# Altium PCB Battery_Module.PcbDoc
Units mm, origin at the board's own origin, x right, y up, seen from the top; angles counter-clockwise.
Board outline 80 x 50 mm, 2 copper layers (Top Layer, Bottom Layer), stack 1.591 mm thick; 24 components, 15 nets, 103 pads, 111 vias.
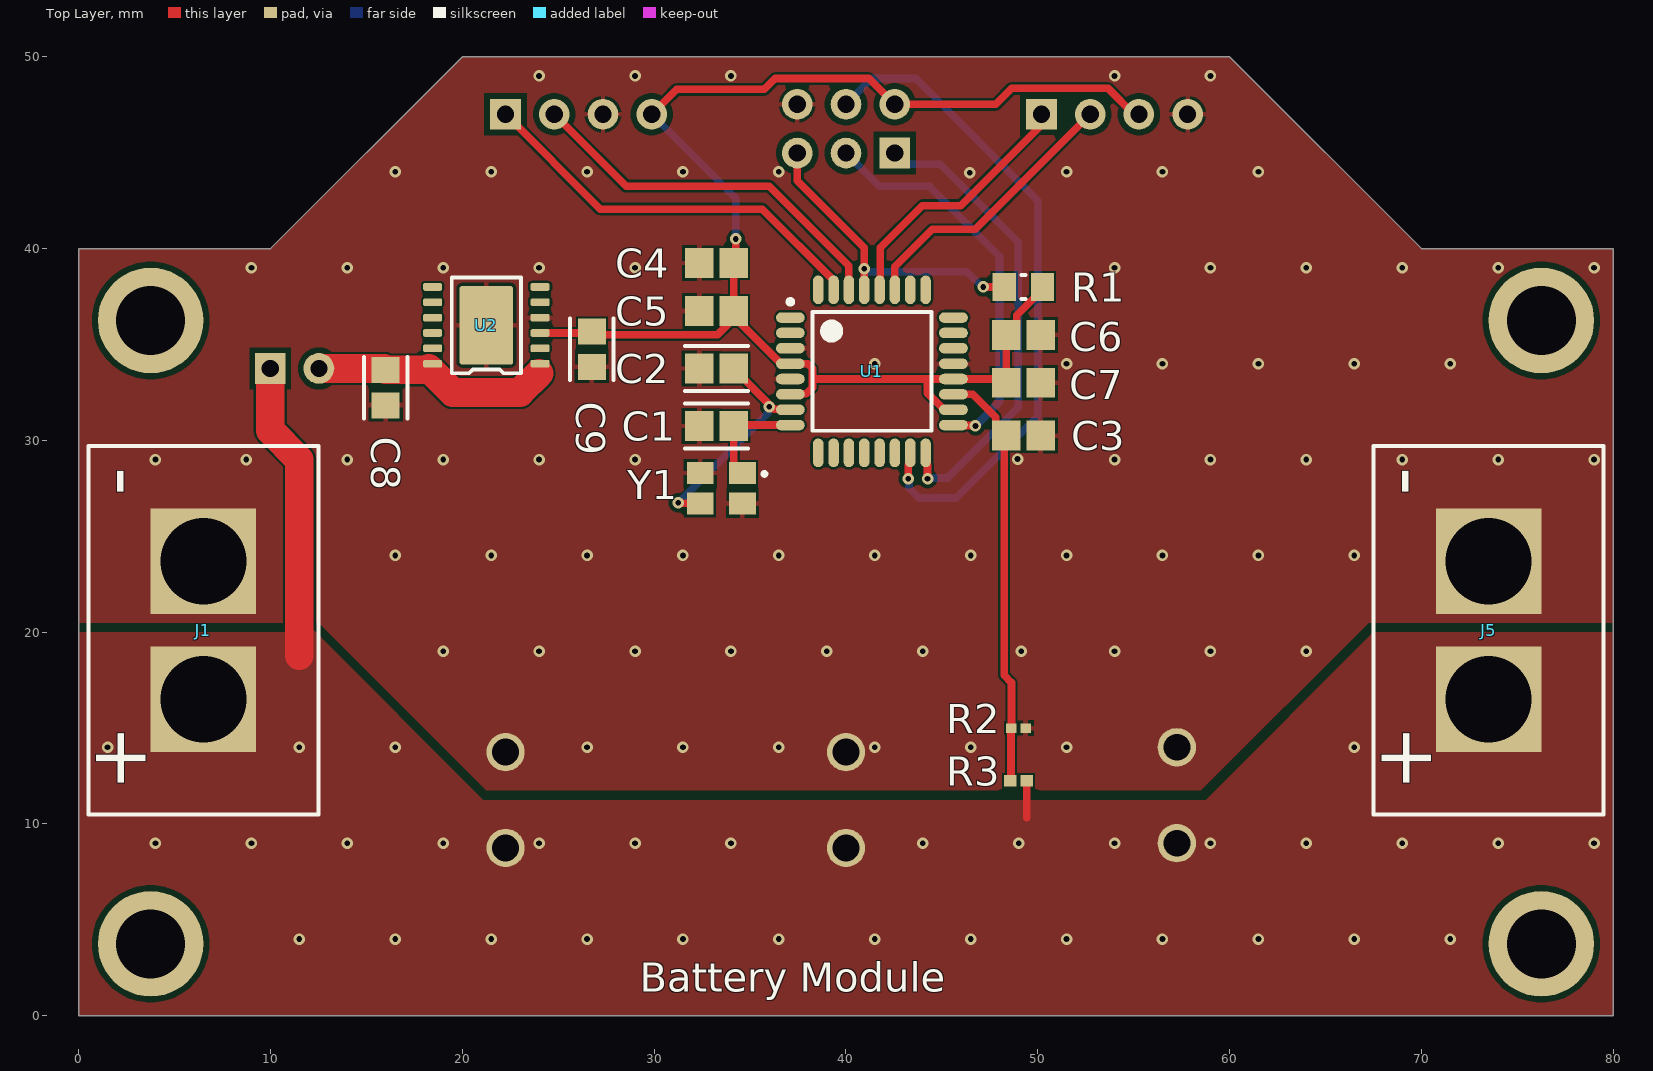
[diagram p0: Top Layer view]
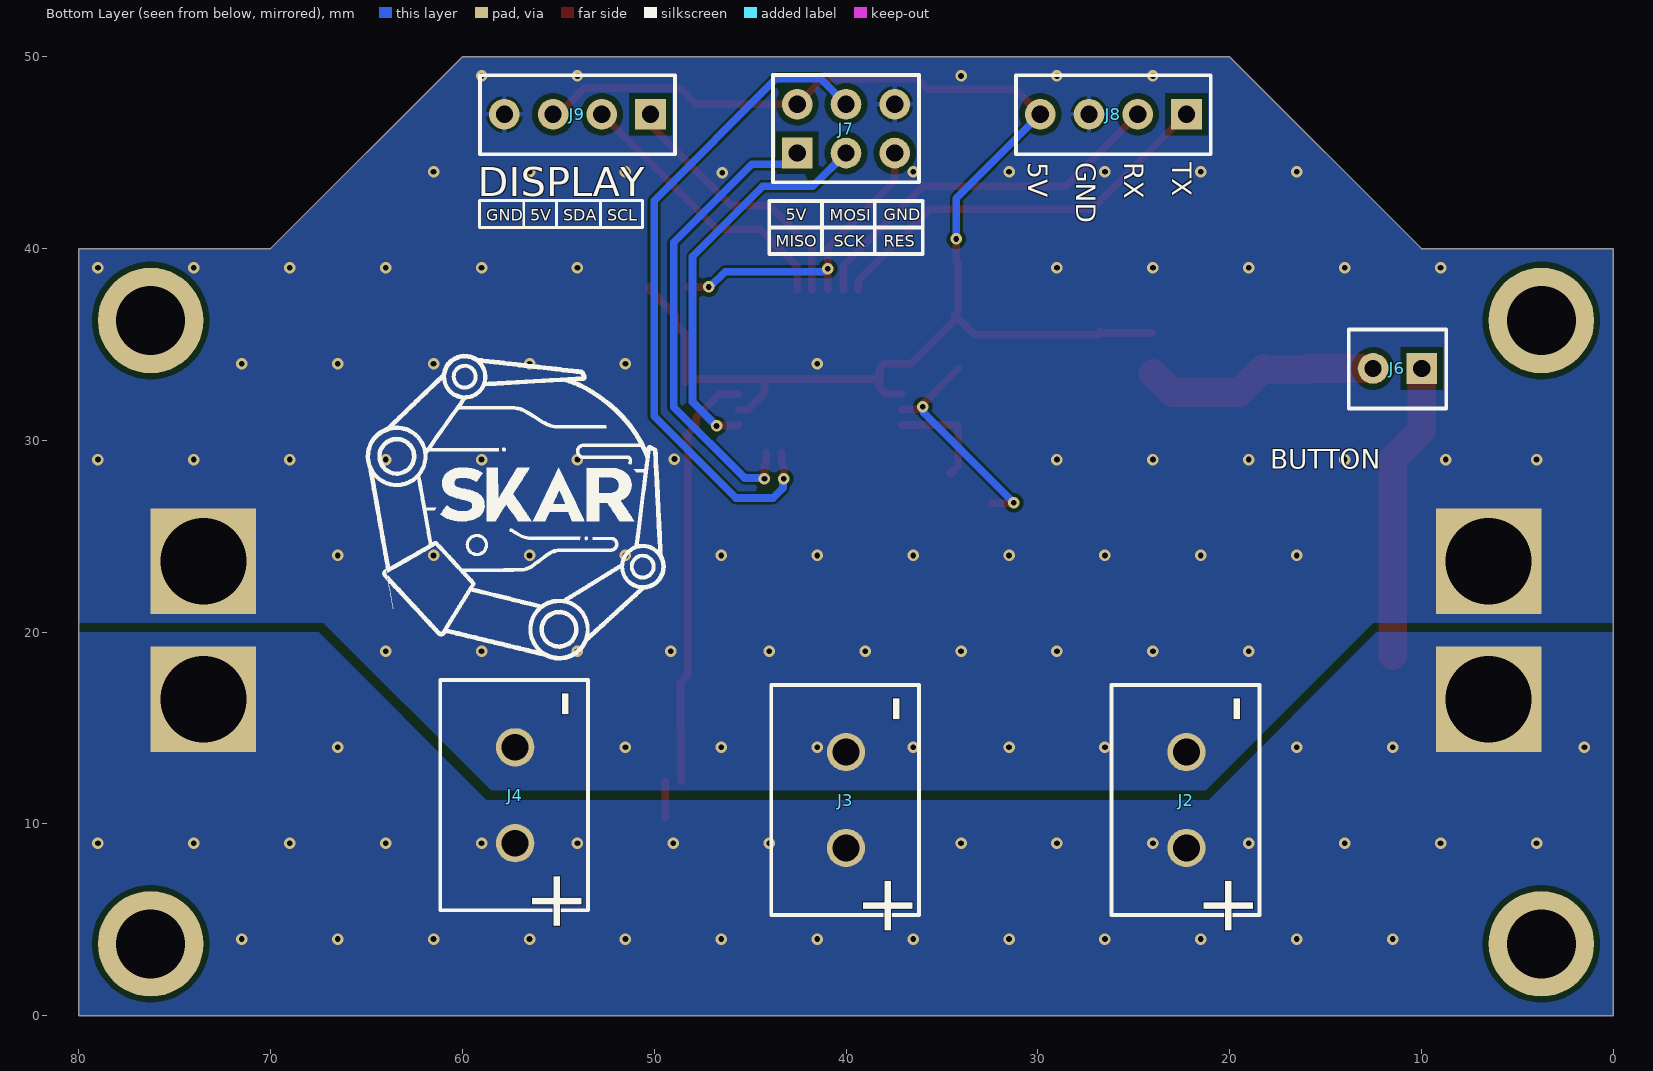
[diagram p1: Bottom Layer view, seen from below]

## Layer stack, top to bottom
Top Solder: solder mask 0.0102, Solder Resist, Dk 3.5
Top Layer: signal copper 0.0356
Dielectric 1: dielectric 1.52, FR-4, Dk 4.8
Bottom Layer: signal copper 0.0356
Bottom Solder: solder mask 0.0102, Solder Resist, Dk 3.5

## Board outline
10,40 20,50 60,50 70,40 80,40 80,0 0,0 0,40

## Design rules (kind name [scope] priority, off if disabled: settings)
Clearance [All] p1: gap=0.12 ignorepadtopadclearanceinfootprint=FALSE except(0.1: Arc-SMDPad Track-SMDPad; 0.15: SMDPad-SMDPad; 0.2: Arc-Via Track-Via Via-Fill Via-Poly Via-Region; 0.3: Arc-Hole Track-Hole SMDPad-Hole THPad-Fill THPad-Poly THPad-Region THPad-Hole Via-Hole Fill-Hole Poly-Hole Region-Hole Text-Hole; 0.35: Arc-THPad Track-THPad)
HoleSize [All] p1: absolutevalues=TRUE maxlimit=5 minlimit=0.025 maxpercent=80.000 minpercent=20.000
MinimumSolderMaskSliver [All] p1: minsoldermaskwidth=0.04
PolygonConnect PolygonConnectPWR [All vs HasFootprint('XT60_FEMALE_PANEL') OR HasFootprint('Phoenix')] p1: connectstyle=Direct reliefconductorwidth=0.254 reliefentries=4 polygonreliefangle="90 Angle" airgapwidth=0.254
PolygonConnect [All] p2: thpad.connectstyle=Relief thpad.reliefconductorwidth=0.254 thpad.reliefentries=4 thpad.polygonreliefangle="90 Angle" thpad.airgapwidth=0.15 smdpad.connectstyle=Relief smdpad.reliefconductorwidth=0.254 smdpad.reliefentries=4 smdpad.polygonreliefangle="90 Angle" smdpad.airgapwidth=0.15 via.connectstyle=Direct via.reliefconductorwidth=0.254 via.reliefentries=4 via.polygonreliefangle="90 Angle" via.airgapwidth=0.15
RoutingVias [All] p1: holewidth=0.2 width=0.4 viastyle="Through Hole" minholewidth=0.2 minwidth=0.4 maxholewidth=5 maxwidth=10
SilkToSilkClearance [All] p1: silktosilkclearance=0
SilkToSolderMaskClearance [IsPad] p1: minsilkscreentomaskgap=0.015 clearancetoexposedcopper=TRUE
SolderMaskExpansion [All] p1: expansion=0.04 istentingtop=FALSE
SupplyNets "Schematic Supply Nets_2" [InNet('VIN')] p1: voltage=0.000
SupplyNets "Schematic Supply Nets_1" [InNet('+5V')] p2: voltage=0.000
SupplyNets "Schematic Supply Nets" [InNet('GND')] p3: voltage=0.000
Width Width_1 [All] p1: maxlimit=3 minlimit=0.254 preferedwidth=0.4
Width [All] p2: maxlimit=0.625 minlimit=0.254 preferedwidth=0.4 minimp=50.000000 maximp=50.000000 favimp=50.000000
26 further rules are at their usual default settings.

## Components (designator, comment, footprint, x,y, rotation, side; value= is the part's Value field where it differs from the comment)
C1 "16pF" FP-C0805C-DN-IPC_A 33.25,30.75 r0 top value="16 pF"
C2 "16pF" FP-C0805C-DN-IPC_A 33.25,33.75 r0 top value="16 pF"
C3 "100nF" CAPC2013X140X50ML20T25 49.25,30.25 r180 top
C4 "100nF" CAPC2013X140X50ML20T25 33.25,39.25 r180 top
C5 "100nF" CAPC2013X140X50ML20T25 33.25,36.75 r180 top
C6 "100nF" CAPC2013X140X50ML20T25 49.25,35.5 r0 top
C7 "100nF" CAPC2013X140X50ML20T25 49.25,33 r0 top
C8 "10uF" FP-GRM21B-0_1-IPC_A 16,32.75 r270 top
C9 "10uF" FP-GRM21B-0_1-IPC_A 26.75,34.75 r270 top
J1 "XT60" XT60_FEMALE_PANEL 6.5,16.5 r90 top
J2 "Phoenix" PHOENIX 22.25,8.75 r270 bottom
J3 "Phoenix" PHOENIX 40,8.75 r270 bottom
J4 "Phoenix" PHOENIX 57.25,9 r270 bottom
J5 "XT60" XT60_FEMALE_PANEL 73.5,16.5 r90 top
J6 "BUTTON" HEADER1X2 11.25,33.75 r270 bottom
J7 "" "HEADER2X3 - DUPLICATE" 40,46.25 r90 bottom
J8 "" HEADER1X4 26.06,47 r270 bottom
J9 "DISPLAY" HEADER1X4 54,47 r270 bottom
R1 "10k" RESC2013X60X35ML10T20 49.25,38 r0 top
R2 "10k" RESC1005X40X25LL10T10 49,15 r180 top
R3 "51K" RESC1005X40X25NL10T10 49,12.25 r0 top
U1 "ATMEGA328P-AU" ATMEGA328P-AU 41.35,33.6 r0 top
U2 "L99VR035PTR" PWSSO-12 21.25,36 r90 top
Y1 "16MHz" WE-XTAL_CFPX-180 33.5,27.5 r180 top

## Footprints (in the part's own frame and the unit in brackets; to place one, negate y for a bottom-side part, rotate by r counter-clockwise, add the part's x,y. Pads: shape width x height; smd on the part's side, far side on the other; paste and mask are expansions set on the pad)
ATMEGA328P-AU [mm] "TQFP, 32-Leads, Body 7,00x7,00mm, Pitch 0,80mm, IPC Medium Density"
  oval 1.5x0.55 smd: 1(-4.25,2.8) 2(-4.25,2) 3(-4.25,1.2) 4(-4.25,0.4) 5(-4.25,-0.4) 6(-4.25,-1.2) 7(-4.25,-2) 8(-4.25,-2.8) 17(4.25,-2.8) 18(4.25,-2) 19(4.25,-1.2) 20(4.25,-0.4) 21(4.25,0.4) 22(4.25,1.2) 23(4.25,2) 24(4.25,2.8)
  oval 0.55x1.5 smd: 9(-2.8,-4.25) 10(-2,-4.25) 11(-1.2,-4.25) 12(-0.4,-4.25) 13(0.4,-4.25) 14(1.2,-4.25) 15(2,-4.25) 16(2.8,-4.25) 25(2.8,4.25) 26(2,4.25) 27(1.2,4.25) 28(0.4,4.25) 29(-0.4,4.25) 30(-1.2,4.25) 31(-2,4.25) 32(-2.8,4.25)
  silkscreen extent -4.37,-3.1 3.1,3.75, body extent -4.5,-4.5 4.5,4.5, height 1.2
CAPC2013X140X50ML20T25 [mm] "Chip Capacitor, 2-Leads, Body 2.00x1.25mm, IPC Low Density"
  rect 1.5x1.55 smd: 1(-0.9,0) 2(0.9,0)
  body extent -1.1,-0.72 1.1,0.72, height 1.4
FP-C0805C-DN-IPC_A [mm]
  rect 1.505x1.556 smd paste+0 mask+0: 1(-0.901,0) 2(0.901,0)
  silkscreen extent -1.65,-1.18 1.65,1.18, body extent -2.15,-1.28 2.15,1.28, height 0.25
FP-GRM21B-0_1-IPC_A [mm]
  rect 1.358x1.462 smd paste+0 mask+0: 1(-0.927,0) 2(0.927,0)
  silkscreen extent -1.61,-1.13 1.61,1.13, body extent -2.11,-1.23 2.11,1.23, height 0.25
HEADER1X2 [mm]
  rect 1.6x1.6 hole 0.9: 1(0,1.27)
  round 1.6 hole 0.9: 2(0,-1.27)
  silkscreen extent -2.03,-2.54 2.08,2.54, body extent -1.27,-2.54 1.27,2.54, height 9.5
HEADER1X4 [mm]
  rect 1.6x1.6 hole 0.9: 1(0,3.81)
  round 1.6 hole 0.9: 2(0,1.27) 3(0,-1.27) 4(0,-3.81)
  silkscreen extent -2.03,-5.08 2.08,5.08, body extent -1.27,-5.08 1.27,5.08, height 9.5
"HEADER2X3 - DUPLICATE" [mm]
  rect 1.6x1.6 hole 0.9: 1(-1.27,2.54)
  round 1.6 hole 0.9: 2(-1.27,0) 3(-1.27,-2.54) 4(1.27,-2.54) 5(1.27,0) 6(1.27,2.54)
  silkscreen extent -2.79,-3.81 2.79,3.81, body extent -2.54,-3.81 2.54,3.81, height 9.5
PHOENIX [mm]
  round 2 hole 1.4 paste-2539.97: 1(0,0) 2(-5,0)
  silkscreen extent -8.5,-3.9 3.5,3.8, body extent -8.5,-3.87 3.5,4.7, height 12.1
PWSSO-12 [mm] "L99VR035PTR"
  rrect50% 0.4x1 smd: 1(-2,-2.8) 2(-1.2,-2.8) 3(-0.4,-2.8) 4(0.4,-2.8) 5(1.2,-2.8) 6(2,-2.8) 7(2,2.8) 8(1.2,2.8) 9(0.4,2.8) 10(-0.4,2.8) 11(-1.2,2.8) 12(-2,2.8)
  rrect10% 4.1x2.8 smd: TAB(0,0)
  silkscreen extent -2.5,-1.8 2.5,1.8, body extent -2.5,-3.1 2.5,3.1, height 1.63
RESC1005X40X25LL10T10 [mm] "Chip Resistor, 2-Leads, Body 1.00x0.50mm, IPC High Density"
  rect 0.55x0.5 smd: 1(-0.375,0) 2(0.375,0)
  body extent -0.55,-0.3 0.55,0.3, height 0.4
RESC1005X40X25NL10T10 [mm] "Chip Resistor, 2-Leads, Body 1.00x0.50mm, IPC Medium Density"
  rect 0.65x0.6 smd: 1(-0.425,0) 2(0.425,0)
  body extent -0.55,-0.3 0.55,0.3, height 0.4
RESC2013X60X35ML10T20 [mm] "Chip Resistor, 2-Leads, Body 2.1x1.35mm, IPC Low Density"
  rect 1.2x1.45 smd: 1(-1,0) 2(1,0)
  silkscreen extent -0.1,-0.63 0.1,0.63, body extent -1.05,-0.68 1.05,0.67, height 0.6
WE-XTAL_CFPX-180 [mm] "Quartz Crystal, size CFPX-180, body 3.4x2.7mm"
  rect 1.4x1.15 smd: 1(-1.1,-0.8) 2(1.1,-0.8) 3(1.1,0.8) 4(-1.1,0.8)
  silkscreen extent -2.35,-0.85 -2.15,-0.65, body extent -1.7,-1.35 1.7,1.35, height 0.65
XT60_FEMALE_PANEL [mm]
  rect 5.5x5.5 hole 4.5 paste-2539.97: 1(0,0) 2(7.2,0)
  silkscreen extent -6,-6 13.2,6, body extent -13.45,-7.88 20.55,7.88, height 15.5

## Part data
C1 C2: library part CMP-03020-014624-1, "C0805C160J5GACTU / CAP CER 16PF 50V NP0 0805", Capacitance="16 pF", Manufacturer=KEMET, Manufacturer Part Number=C0805C160J5GACTU, Package=C0805C-DN, Temperature="-55°C to +125°C", Temperature Characteristic=C0G, Temperature Coefficient=30ppm/°C, Temperature Range High=+125°C, Temperature Range Low=-55°C, Tolerance=0.05, Voltage Rating="50 V", Automotive=No, Category=Cap, ComponentLink2Description=Datasheet, ComponentLink2URL=https://content.kemet.com/datasheets/KEM_C1003_C0G_SMD.pdf, Device Class L1="Passive Components", Device Class L2=Capacitors, Device Class L3="Ceramic Capacitors", Digikey Description="CAP CER 16PF 50V NP0 0805", Height=0.88mm, Ipc Land Pattern Name=CAPC200125X78, Lead Free=Yes, Material=Ceramic, Mouser Description="Capacitor, Ceramic, 16Pf, 50Vdc, 5-% Tol, 5+% Tol, C0g-Tc Code, -30, 30Ppm-Tc Rohs Compliant: Yes", Octopart=https://octopart.com/c0805c160j5gactu-kemet-11800741, RoHS=TRUE
C3 C4 C5 C6 C7: library part CMP-2007-04784-1, Manufacturer="AVX Interconnect / Elco", Part Number=08055F104KAT2A
C8 C9: library part CMP-2007-03462-2, "Chip Multilayer Ceramic Capacitors for General Purpose, 0805, 10uF, X6S, 22%, 10%, 10V", Case Code (Imperial)=0805, Case Code (Metric)=2012, Dielectric=X6S, Max Operating Temperature=105°C, Min Operating Temperature=-55°C, Package Quantity=3000, Tolerance=10%, Voltage=10V, Capacitance=10uF, Case/Package=0805, Depth=1.25mm, Height=1.25mm, Lead Free="Lead Free", Length=2mm, Material=Ceramic, Mount="Surface Mount", Packaging="Tape and Reel", Radiation Hardening=No, REACH SVHC="No SVHC", Termination=SMD/SMT, Thickness=0.053inch, Voltage Rating=10V, Voltage Rating (DC)=10V, Width=1.25mm
J1 J2 J3 J4 J5 J6: library part Connector_2
J7: library part "Header 2x3"
J8: library part UART
J9: library part "IIC for Display"
R1: library part CMP-1659-00013-4, "RC0805FR-0710KL / Chip Resistor, 10 KOhm, +/- 1%, 0.125 W, -55 to 155 degC, 0805 (2012 Metric), RoHS, Tape and Reel", Manufacturer=Yageo, Max Operating Temperature="155 degC", Min Operating Temperature="-55 degC", Package Quantity=5000, Voltage Rating="150 V", ComponentLink1Description="Manufacturer URL", ComponentLink1URL=http://www.yageo.com/, ComponentLink2Description=Datasheet, ComponentLink2URL=http://www.yageo.com/documents/recent/PYu-RC_Group_51_RoHS_L_04.pdf, DatasheetVersion="Rev. 4, 02/2016", Height="0.5 mm", Length="2 mm", Mount="Surface Mount", Mounting Technology="Surface Mount", PackageDescription="2-Pin Surface Mounted Device, Body 2 x 1.25 mm", PackageReference=0805, Packaging="Tape and Reel", Pins=2, REACH SVHC="No SVHC", RoHSCompliant=true
R2: library part CMP-2002-04584-1, Manufacturer="KOA Speer", Part Number=SG73P1ETTP1002F
R3: library part CMP-2002-05743-1, Manufacturer="TE Connectivity / AMP", Part Number=CRG0402F51K
U1: "8-bit Microcontrollers - MCU 32KB In-system Flash 20MHz 1.8V-5.5V"
U2: library part CMP-003-000000-1, "LDO Voltage Regulators Automotive Low Dropout Linear Voltage Regulator 300 mA of current capability", Design Item ID=L99VR035PTR, Source=Schlib1.SchLib
Y1: library part CMP-03913-116876453-1, "830035264 WE-XTAL Quartz Crystal", Max Operating Temperature=60°C, Min Operating Temperature=-10°C, Frequency=16MHz, Height=800µm, Length=3.2mm, NexarPartId=116876453, Width=2.5mm

## Free pads (board coordinates)
  round 5.5 hole 3.6: 11(3.75,3.75) 11(3.75,36.25) 11(76.25,3.75) 11(76.25,36.25)

## Via types
v1: diameter 0.6, hole 0.3, Top Layer to Bottom Layer, tented both sides, 103 vias
v2: diameter 0.6, hole 0.3, Top Layer to Bottom Layer, 8 vias

## Nets (pads, with @x,y where several pads share a name; then routed paths per layer and width w, separated by ;. In a path a pad name is that pad's centre, name@x,y a point inside that pad or via, vN(x,y) a via of type N, cw(c..) or ccw(c..) an arc to the next point about the centre after c; other vN are vias at no path point)
+5V: C4.1 C5.1 C6.1 C7.1 C9.1 J7.6 J8.4 J9.3 R1.2 U1.4 U1.6 U1.18 U1.20 U2.3 | length 76.7
  Top Layer w0.4: U2.3 26.673,35.6 C9.1 26.927,35.5 33.3,35.5 C5.1@34.206,36.406 ; J8.4 31.17,48.3 35.742,48.3 36.312,48.87 41.19,48.87 J7.6 47.815,47.52 48.645,48.35 53.66,48.35 55.01,47 J9.3 ; v2(34.25,40.5) 34.25,39.35 C4.1 C5.1 34.35,36.55 C5.1@34.206,36.406 ; U1.6 37.129,32.429 37.929,32.429 38.25,32.75 38.25,33.25 ; U1.18 45.112,31.6 44.25,32.462 44.25,33.2 ; R1.2 50.25,37.875 48.9,36.525 48.9,36.05 C6.1 C7.1 48.15,33.2 U1.20 44.25,33.2 ; C5.1@34.206,36.406 36.612,34 U1.4 37.106,33.994 38.006,33.994 38.25,33.75 38.25,33.25 ; 38.25,33.25 38.3,33.2 44.25,33.2
  Bottom Layer w0.4: J8.4 34.25,42.62 v2(34.25,40.5)
GND: C1.1 C2.1 C3.1 C4.2 C5.2 C6.2 C7.2 C8.2 C9.2 J1.2 J2.2 J3.2 J4.2 J5.2 J7.4 J8.3 J9.4 R2.1 U1.3 U1.5 U1.21 U2.4 U2.TAB Y1.2 Y1.4
  other v1: 26.5,14 31.5,14 36.5,14 41.5,14 46.5,14 51.5,14 19,19 24,19 29,19 34,19 39,19 44,19 49.138,19 54,19 59,19 64,19 16.5,24 21.5,24 26.5,24 31.5,24 36.5,24 41.5,24 46.5,24 51.5,24 56.5,24 61.5,24 66.5,24 4,29 8.73,29 14,29 19,29 24,29 29,29 54,29 59,29 64,29 69,29 74,29 79,29 48.945,29.025 41.5,34 51.5,34 56.5,34 61.5,34 66.5,34 71.5,34 9,39 14,39 19,39 24,39 29,39 54,39 59,39 64,39 69,39 74,39 79,39 46.45,43.95 16.5,44 21.5,44 26.5,44 31.5,44 36.5,44 51.5,44 56.5,44 61.5,44 24,49 29,49 34,49 54,49 59,49
MISO: J7.1 U1.16 | length 24.6
  Top Layer w0.4: U1.16 44.15,28.834 44.25,28.734 v2(44.25,28)
  Bottom Layer w0.4: J7.1 43.124,44.396 44.904,44.396 48.98,40.32 48.98,31.73 45.288,28.038 44.288,28.038 v2(44.25,28)
MOSI: J7.5 U1.15 | length 35
  Top Layer w0.4: v2(43.25,28) 43.25,28.734 43.35,28.834 U1.15
  Bottom Layer w0.4: J7.5 41.35,48.87 43.63,48.87 50,42.5 50,31.25 45.75,27 43.8,27 43.288,27.512 43.288,27.962 v2(43.25,28)
NetC1_2: C1.2 U1.8 Y1.1 | length 5.6
  Top Layer w0.4: Y1.1 34.526,28.3 34.151,28.675 C1.2 34.201,30.8 U1.8
NetC2_2: C2.2 U1.7 Y1.3 | length 12
  Top Layer w0.4: v2(31.25,26.75) 31.275,26.725 32.375,26.725 Y1.3 ; C2.2 34.151,33.724 36.246,31.629 37.071,31.629 U1.7
  Bottom Layer w0.4: v2(31.25,26.75) 35.962,31.462 35.962,31.712 v2(36,31.75)
NetC3_2: C3.2 R2.2 R3.1 U1.19 | length 22.1
  Top Layer w0.4: U1.19 46.6,32.4 47.8,31.2 47.8,30.8 C3.2 48.245,30.145 48.245,17.755 48.625,17.375 R2.2 48.6,14.975 48.6,12.275 R3.1
NetC8_1: C8.1 J6.2 U2.1 U2.12 | length 12.5
  Top Layer w1.5: J6.2 15.927,33.75 C8.1 18.177,33.677 18.25,33.75 19.5,32.5 23,32.5 24,33.5
RESET: J7.3 R1.1 U1.29 | length 16.3
  Top Layer w0.4: J7.3 37.46,43.54 40.95,40.05 v2(40.95,38.95) U1.29 ; v2(47.15,38) R1.1
  Bottom Layer w0.4: v2(40.95,38.95) 41.004,38.95 41.154,38.8 46.296,38.8 47.096,38 v2(47.15,38)
RX: J8.2 U1.30 | length 19.9
  Top Layer w0.4: J8.2 28.54,43.25 36,43.25 40.15,39.1 U1.30
SCK: J7.2 U1.17 | length 20.8
  Top Layer w0.4: U1.17 45.625,30.775 46.725,30.775 v2(46.75,30.75)
  Bottom Layer w0.4: J7.2 41.73,43.25 44.35,43.25 48,39.6 48,32 v2(46.75,30.75)
SCL: J9.1 U1.28 | length 13.8
  Top Layer w0.4: U1.28 41.779,37.879 41.779,38.46 41.792,38.473 41.792,40.042 43.985,42.235 45.985,42.235 50.19,46.44 J9.1
SDA: J9.2 U1.27 | length 14.7
  Top Layer w0.4: U1.27 42.55,39.05 44.5,41 46.73,41 J9.2
TX: J8.1 U1.31 | length 21.2
  Top Layer w0.4: J8.1 27.195,42.055 35.633,42.055 39.35,38.338 U1.31
VIN: J1.1 J2.1 J3.1 J4.1 J5.1 J6.1 R3.2 | length 17.5
  Top Layer w0.4: 49.425,10.325 R3.2
  Top Layer w1.5: J6.1 9.98,30.52 11.5,29 11.5,18.779
  other v1: 11.5,4 16.5,4 21.5,4 26.5,4 31.5,4 36.5,4 41.5,4 46.5,4 51.5,4 56.5,4 61.5,4 66.5,4 71.5,4 4,9 9,9 14,9 19,9 24,9 29,9 34,9 44,9 49,9 54,9 59,9 64,9 69,9 74,9 79,9 1.5,14 11.5,14 16.5,14 66.5,14
pads on no net: U1.1 U1.2 U1.9 U1.10 U1.11 U1.12 U1.13 U1.14 U1.22 U1.23 U1.24 U1.25 U1.26 U1.32 U2.2 U2.5 U2.6 U2.7 U2.8 U2.9 U2.10 U2.11

## Polygon pours and split planes (outlines as drawn)
GND on Top Layer "GND_L01_P002" (solid, pour order 2): 0,20.5 12.5,20.5 21.25,11.75 58.5,11.75 67.25,20.5 67.75,20.5 80,20.5 80,40 70,40 60,50 20,50 10,40 0,40
VIN on Top Layer "VIN_L01_P000" (solid, pour order 0): 0,0 80,0 80,20 67.5,20 58.75,11.25 21.1,11.25 12.25,20.1 12.15,20 0,20
GND on Bottom Layer "GND_L02_P005" (solid, pour order 5): 0,20.5 12.5,20.5 21.25,11.75 58.5,11.75 67.25,20.5 80,20.5 80,40 70,40 60,50 20,50 10,40 0,40
VIN on Bottom Layer "VIN_L02_P004" (solid, pour order 4): 0,20 12.35,20 21.1,11.25 58.75,11.25 67.5,20 80,20 80,0 0,0

## Silkscreen, mask and mechanical layers (free items; w line width, h text height)
Top Overlay:
  text "Battery Module" at 29.254,1.262 h1.52
Bottom Overlay:
  drawing of 35 lines, arcs and shapes, not listed
  text "TX" at 22.996,44.496 h1 r90
  text "RX" at 25.496,44.496 h1 r90
  text "GND" at 27.996,44.496 h1 r90
  text "5V" at 30.496,44.496 h1 r90
  text "GND" at 38.025,41.475 h0.6
  text "5V" at 43.15,41.475 h0.6
  text "MOSI" at 40.85,41.45 h0.6
  text "SCL" at 52.45,41.45 h0.6
  text "SDA" at 54.75,41.45 h0.6
  text "5V" at 56.45,41.45 h0.6
  text "GND" at 58.75,41.45 h0.6
  text "RES" at 38.025,40.1 h0.6
  text "SCK" at 40.65,40.1 h0.6
  text "MISO" at 43.675,40.1 h0.6

## Dimensions
76.25,3.75 to 80,0 on Top Assembly
80,-0.254 to 76.25,3.75 on Top Assembly
60,50 to 80,0 on Top Assembly
0,40 to 0,0 on Top Assembly
0,40 to 10,40 on Top Assembly
80,40 to 70,40 on Top Assembly
20,50 to 60,50 on Top Assembly
0,0 to 80,0 on Top Assembly

## Text inside footprints (layer, text, board x,y; h text height)
J1: Top Overlay "-" at 3.3,27.1 h3 r90; Top Overlay "+" at 3.5,11.7 h3 r90
J2: Bottom Overlay "-" at 20.75,16.75 h3 r90; Bottom Overlay "+" at 21.35,7.45 h3 r90
J3: Bottom Overlay "-" at 38.5,16.75 h3 r90; Bottom Overlay "+" at 39.1,7.45 h3 r90
J4: Bottom Overlay "+" at 56.35,7.7 h3 r90; Bottom Overlay "-" at 55.75,17 h3 r90
J5: Top Overlay "+" at 70.5,11.7 h3 r90; Top Overlay "-" at 70.3,27.1 h3 r90